# Altium PCB cm4gateway.PcbDoc (part 4 of 5)
Units mil, origin at the board's own origin, x right, y up, seen from the top; angles counter-clockwise.
Board outline 6299.21 x 4960.63 mil, 8 copper layers (Signal 1, Ground Plane 1, Signal 2, Power Plane 1, Power Plane 2, Signal 3, Ground Plane 2, Signal 4), stack 60.024 mil thick; 403 components, 273 nets, 1526 pads, 1156 vias.
Unrouted connection lines stored in the file: 5.
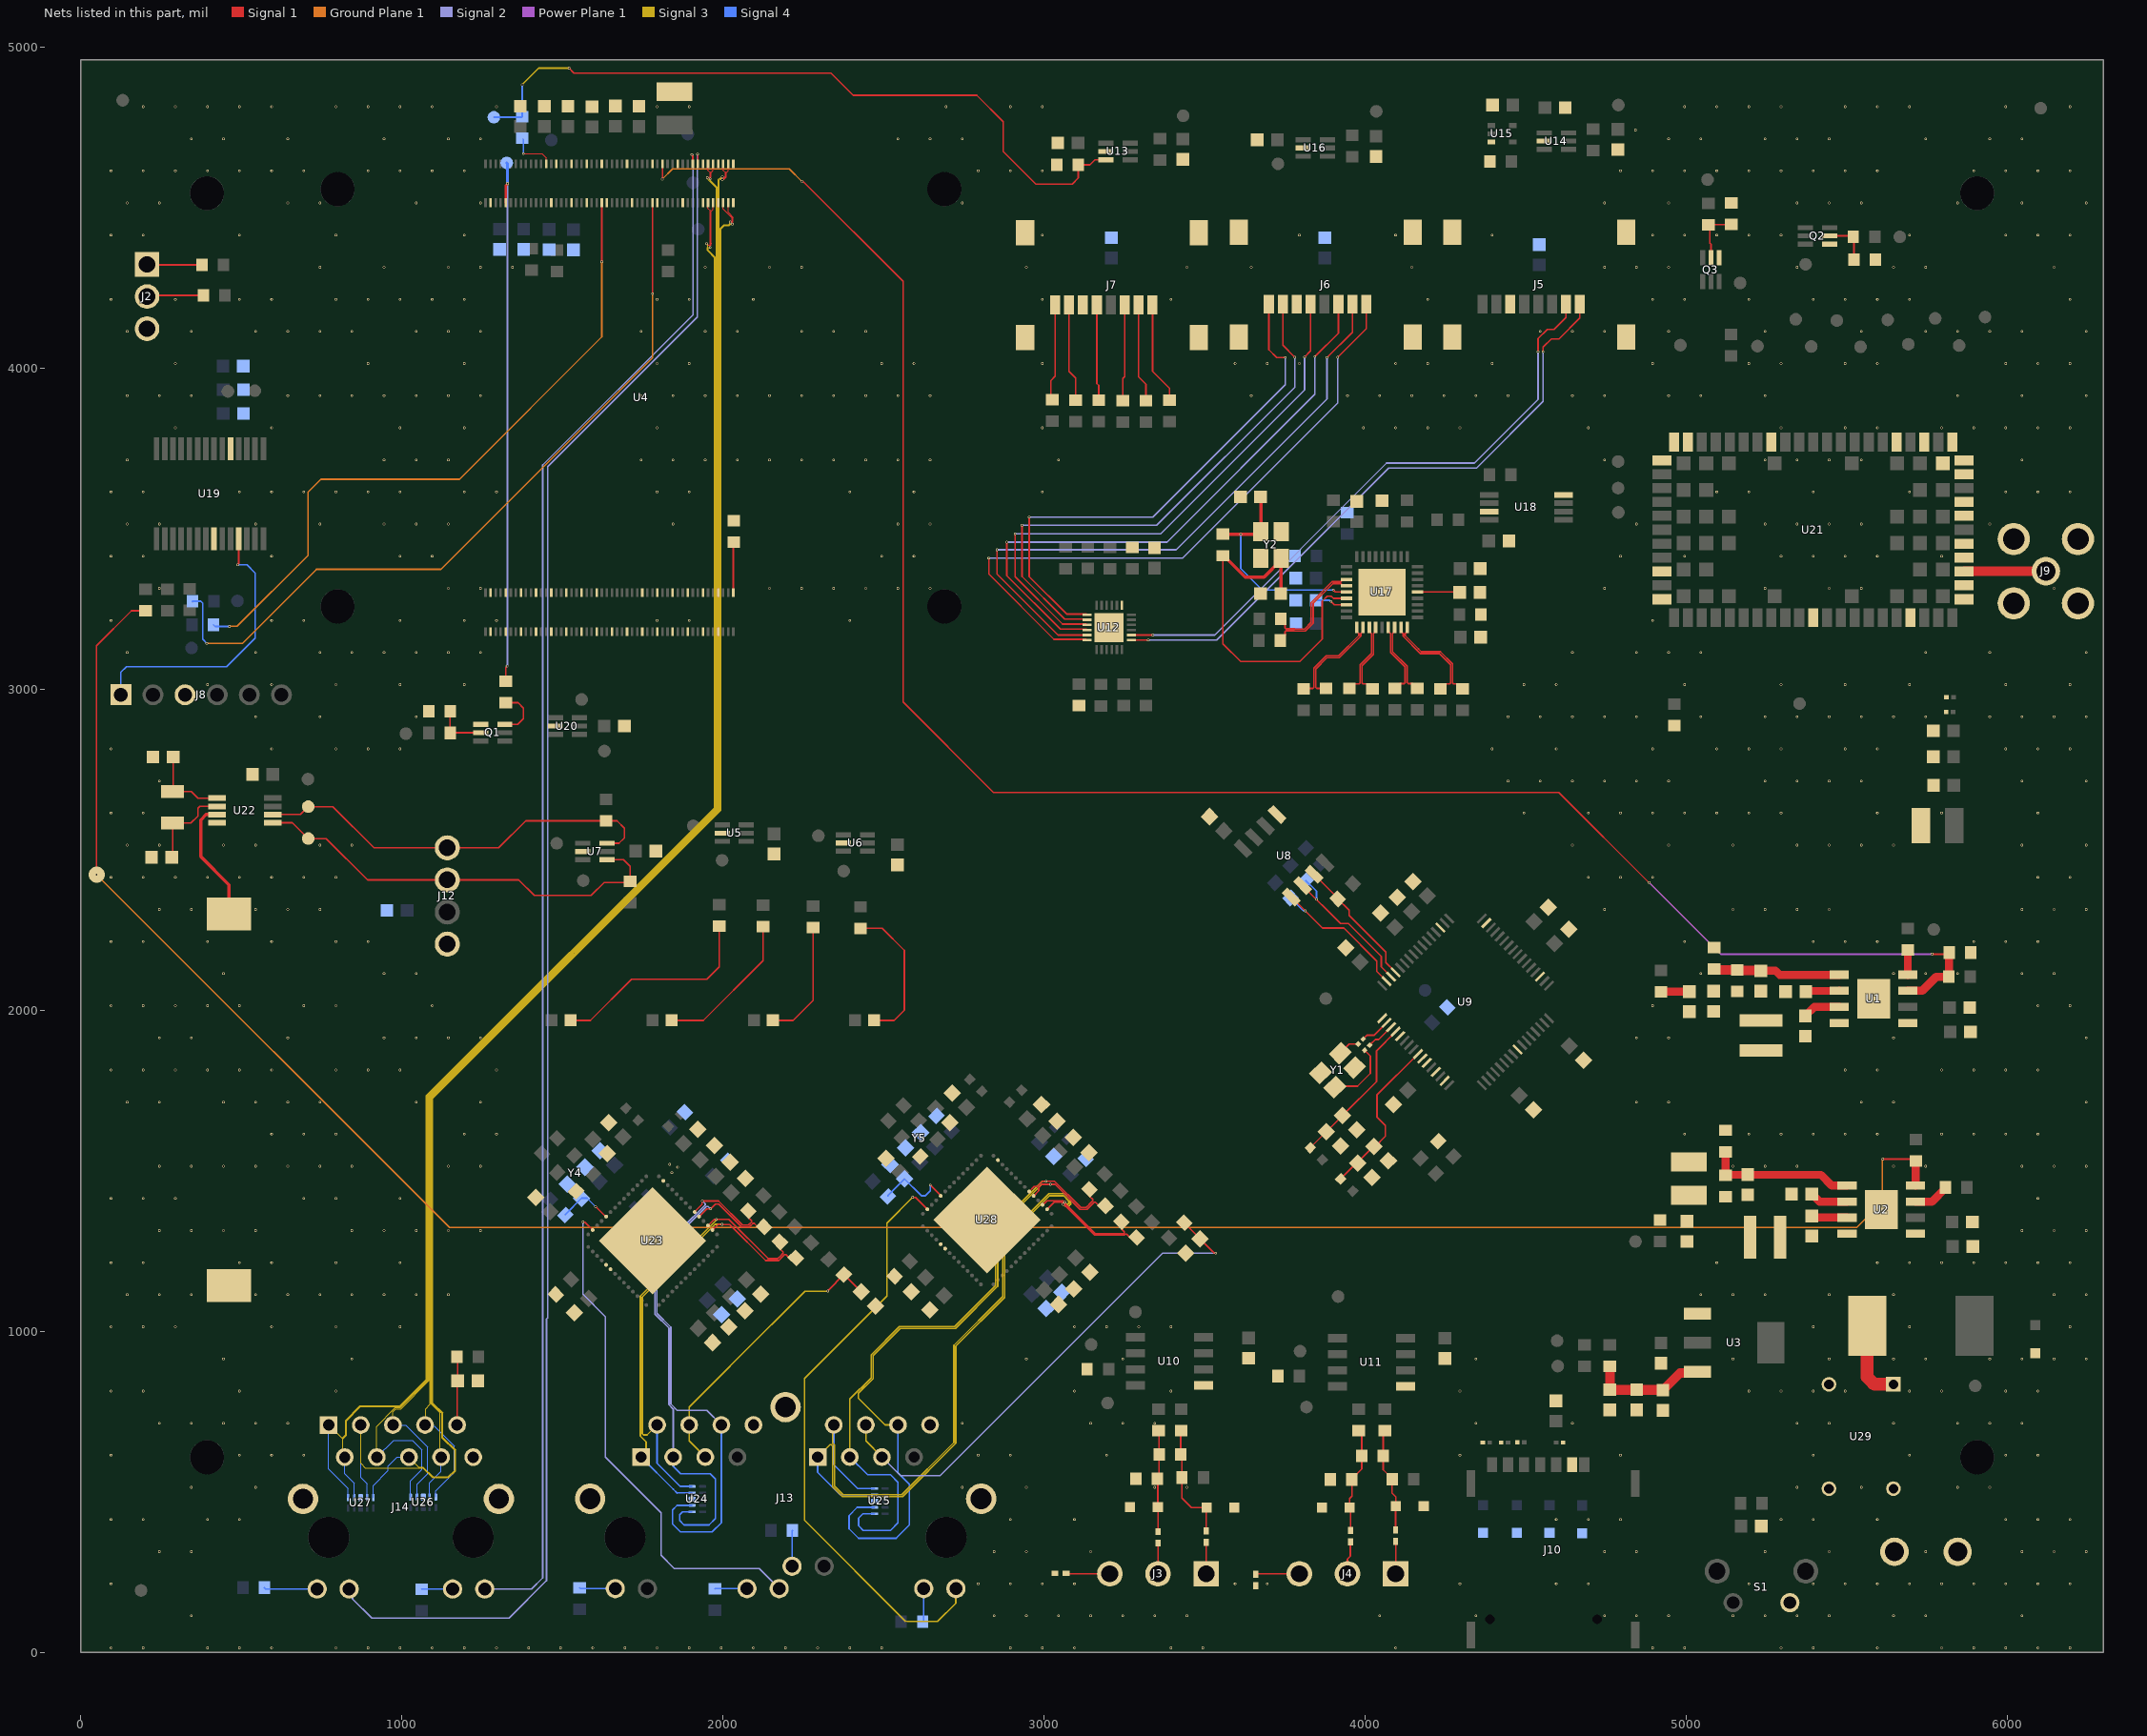
[diagram p9: the nets of this part, all layers, seen from the top]

## Via types
v1: diameter 8/8/8/8/8/8/8/8 (per signal layer), hole 5, Signal 1 to Signal 4, 822 vias
v2: diameter 8, hole 5, Signal 1 to Signal 4, tented both sides, 310 vias
v3: diameter 50, hole 28, Signal 1 to Signal 4, tented both sides, 10 vias
v4: diameter 8/8/8/8/8/8/8/8 (per signal layer), hole 5, Signal 1 to Signal 4, tented both sides, 9 vias
v5: diameter 8, hole 5, Signal 1 to Signal 4, 4 vias
v6: diameter 50, hole 5, Signal 1 to Signal 4, tented both sides, 1 vias

## Nets (pads, with @x,y where several pads share a name; then routed paths per layer and width w, separated by ;. In a path a pad name is that pad's centre, name@x,y a point inside that pad or via, vN(x,y) a via of type N, cw(c..) or ccw(c..) an arc to the next point about the centre after c; other vN are vias at no path point) (continued)
ADAT2: J5.1 U12.7 | length 1954.5
  Signal 1 w5: U12.7@3271.76,3152.56 v2(3324.43,3152.56) ; v2(4554.13,4050.2) 4554.13,4064.96 4579.72,4090.55 4603.35,4090.55 4668.31,4155.51 J5.1@4668.31,4198.82
  Signal 2 w5: v2(3324.43,3152.56) 3537.54,3152.56 4072.97,3687.99 4346.59,3687.99 4554.13,3895.54 v2(4554.13,4050.2)
ADAT3: J5.2 U12.8 | length 1915.3
  Signal 1 w5: U12.8@3271.76,3168.31 v2(3338.9,3168.31) ; v2(4538.39,4050.2) 4538.39,4091.54 4566.93,4120.08 4587.6,4120.08 4625,4157.48 J5.2@4625,4198.82
  Signal 2 w5: v2(3338.9,3168.31) 3531.01,3168.31 4066.45,3703.74 4340.07,3703.74 4538.39,3902.06 v2(4538.39,4050.2)
BCLK: J6.5 U12.21 | length 1782.1
  Signal 1 w5: v2(2909.45,3483.27) 2909.45,3350.14 3057.29,3202.3 3131.26,3202.3 U12.21@3133.76,3199.8 ; v2(3811.02,4034.45) 3829.92,4053.35 J6.5@3829.92,4198.82
  Signal 2 w5: v2(2909.45,3483.27) 3362.87,3483.27 3811.02,3931.42 v2(3811.02,4034.45)
BCMD: J6.3 U12.22 | length 1885.5
  Signal 1 w5: v2(2883.86,3457.68) 2883.86,3353.46 3050.77,3186.56 3131.26,3186.56 U12.22@3133.76,3184.06 ; v2(3843.5,4035.43) 3916.53,4108.46 J6.3@3916.53,4198.82
  Signal 2 w5: v2(2883.86,3457.68) 3382.87,3457.68 3843.5,3918.31 v2(3843.5,4035.43)
BDAT0: J6.7 U12.20 | length 1719.6
  Signal 1 w5: v2(2931.1,3509.84) 2931.1,3350.76 3063.81,3218.05 3131.26,3218.05 U12.20@3133.76,3215.55 ; J6.7@3743.31,4198.82 3743.31,4070.67 v2(3780.51,4033.47)
  Signal 2 w5: v2(2931.1,3509.84) 3350.39,3509.84 3780.51,3939.96 v2(3780.51,4033.47)
BDAT1: J6.8 U12.19 | length 1670.1
  Signal 1 w5: v2(2953.74,3535.43) 2953.74,3350.39 3070.33,3233.8 3131.26,3233.8 U12.19@3133.76,3231.3 ; J6.8@3700,4198.82 3700,4056.89 3724.41,4032.48 v2(3750.98,4032.48)
  Signal 2 w5: v2(2953.74,3535.43) 3338.58,3535.43 3750.98,3947.84 v2(3750.98,4032.48)
BDAT2: J6.1 U12.24 | length 2072.1
  Signal 1 w5: v2(2827.76,3407.48) 2827.76,3358.27 3030.96,3155.06 3131.26,3155.06 U12.24@3133.76,3152.56 ; v2(3914.37,4033.47) 4003.15,4122.24 J6.1@4003.15,4198.82
  Signal 2 w5: v2(2827.76,3407.48) 3431.1,3407.48 3914.37,3890.75 v2(3914.37,4033.47)
BDAT3: J6.2 U12.23 | length 1984.9
  Signal 1 w5: v2(2853.35,3434.06) 2853.35,3358.27 3043.31,3168.31 U12.23@3133.76,3168.31 ; v2(3880.9,4032.48) 3959.84,4111.42 J6.2@3959.84,4198.82
  Signal 2 w5: v2(2853.35,3434.06) 3411.42,3434.06 3880.9,3903.54 v2(3880.9,4032.48)
CPUSUP_PPS: J8.1 U19.11 | length 882.5
  Signal 1 w5: v2(489.17,3386.81) 489.17,3387.62 492.13,3390.58 U19.11@492.13,3468.5
  Signal 4 w5: J8.1@125.2,2982.28 125.2,3052.36 142.72,3069.88 454.72,3069.88 543.31,3158.46 543.31,3361.22 517.72,3386.81 v2(489.17,3386.81)
D1_N: R75.2 U17.1 | length 303.9
  Signal 1 w5: R75.2@3808.07,3000.98 3809.06,3001.97 3836.88,3001.97 3839.81,3004.9 3839.81,3064.73 3878.42,3103.35 3916.9,3103.35 3980.27,3166.71 3980.27,3172.88 3973.42,3179.73 U17.1@3973.42,3191.93
D1_P: R74.2 U17.2 | length 303.9
  Signal 1 w5: R74.2@3877.95,3001.97 3848.74,3001.97 3845.81,3004.9 3845.81,3062.25 3880.9,3097.35 3919.39,3097.35 3986.27,3164.23 3986.27,3172.88 3993.11,3179.73 U17.2@3993.11,3191.93
D2_N: R80.2 U17.3 | length 230.7
  Signal 1 w5: R80.2@3950.79,3001.97 3965.02,3016.2 3980.99,3016.2 3983.92,3019.13 3983.92,3075.19 4019.64,3110.91 4019.64,3172.88 4012.79,3179.73 U17.3@4012.79,3191.93
D2_P: R78.2 U17.4 | length 230.7
  Signal 1 w5: R78.2@4022.64,3000.98 4007.42,3016.2 3992.85,3016.2 3989.92,3019.13 3989.92,3072.71 4025.64,3108.43 4025.64,3172.88 4032.48,3179.73 U17.4@4032.48,3191.93
D3_N: R84.2 U17.6 | length 233.1
  Signal 1 w5: U17.6@4071.85,3191.93 4071.85,3179.73 4078.69,3172.88 4078.69,3113.95 4124.46,3068.18 4124.46,3020.12 4121.53,3017.19 4107.74,3017.19 R84.2@4092.52,3001.97
D3_P: R82.2 U17.7 | length 233.1
  Signal 1 w5: U17.7@4091.53,3191.93 4091.53,3179.73 4084.69,3172.88 4084.69,3116.43 4130.46,3070.66 4130.46,3020.12 4133.39,3017.19 4147.18,3017.19 R82.2@4162.4,3001.97
D4_N: R87.2 U17.8 | length 332.5
  Signal 1 w5: U17.8@4111.22,3191.93 4111.22,3179.73 4114.23,3176.71 4115.13,3176.71 4118.06,3173.78 4118.06,3164.23 4172.15,3110.14 4231.39,3110.14 4265.7,3075.84 4265.7,3019.13 4262.77,3016.2 R87.2@4249.47,3016.2 ; R87.2@4249.47,3016.2 R87.2@4234.25,3000.98 R87.2@4249.47,3016.2
D4_P: R86.2 U17.9 | length 332.5
  Signal 1 w5: U17.9@4130.9,3191.93 4130.9,3179.73 4127.89,3176.71 4126.99,3176.71 4124.06,3173.78 4124.06,3166.71 4165.56,3125.21 4174.63,3116.14 4233.88,3116.14 4271.7,3078.32 4271.7,3019.13 4274.63,3016.2 R86.2@4287.93,3016.2 ; R86.2@4287.93,3016.2 R86.2@4303.15,3000.98 R86.2@4287.93,3016.2
D_N: R76.1 U17.30 | length 327
  Signal 1 w5: R76.1@3737.2,3218.5 3750.45,3205.26 3750.45,3190.56 3753.38,3187.63 3781.15,3187.63 3781.78,3187.01 3811.02,3187.01 3831.6,3207.58 3831.6,3269.22 3897.07,3334.69 3923.78,3334.69 3926.71,3337.62 3926.71,3338.52 3929.72,3341.54 U17.30@3941.93,3341.54
D_P: R77.1 U17.31 | length 327
  Signal 1 w5: R77.1@3735.24,3151.58 3750.45,3166.79 3750.45,3178.7 3753.38,3181.63 3778.67,3181.63 3779.29,3181.01 3813.51,3181.01 3837.6,3205.1 3837.6,3266.73 3899.56,3328.69 3923.78,3328.69 3926.71,3325.76 3926.71,3324.86 3929.72,3321.85 U17.31@3941.93,3321.85
EECLK: R33.1 U8.2 U9.62 | length 484.1
  Signal 1 w5: U8.2@3804.9,2388.09 3923.45,2269.55 3947.69,2269.55 4050.12,2167.12 4050.12,2134.77 U9.62@4080.62,2104.27
  Signal 4 w5: R33.1@3815.22,2403.55 3848.42,2370.35 v2(3848.42,2345.47)
EECS: R32.1 U8.1 U9.63 | length 487.4
  Signal 1 w5: U8.1@3769.55,2352.74 3866.66,2255.63 3933.77,2255.63 4036.2,2153.2 4036.2,2120.85 U9.63@4066.7,2090.35
  Signal 4 w5: R32.1@3767.03,2349.38 3806.78,2309.63 3812.42,2309.63 v2(3812.99,2309.06)
EEDATA: R35.1 U8.3 U9.61 | length 410.6
  Signal 1 w5: U8.3@3840.26,2423.45 3914.59,2349.12 R35.1@3914.59,2346.42 3949.8,2311.21 3949.8,2295.28 4064.04,2181.04 4064.04,2148.69 U9.61@4094.54,2118.19
ETH_LEDG: J14.14 U4.17 | length 4853.3
  Signal 1 w5: v2(1903.29,4664.69) 1903.29,4663.88 1906.27,4660.9 U4.17@1906.27,4635.66
  Signal 2 w5: J14.14@1258.33,197.35 1404.04,197.35 1438.98,232.28 1438.98,3697.83 1906.5,4165.36 1906.5,4662.4 v2@1903.54,4665.35
ETH_LEDY: J14.12 U4.15 | length 5381.2
  Signal 1 w5: v2(1921.01,4665.68) 1921.01,4664.86 1922.02,4663.85 U4.15@1922.02,4635.66
  Signal 2 w5: J14.12@836.28,197.35 846.77,186.86 846.77,166.02 906.5,106.3 1333.66,106.3 1450.79,223.42 1450.79,1037.67 1454.35,1041.23 1454.35,3692.54 1920.27,4158.47 1920.27,4665.35 v2@1921.26,4666.34
ETH_P0_N: J14.2 U4.10 U27.2 | length 4618.4
  Signal 1 w2: v2(1960.1,4375.53) 1960.93,4376.35 1960.93,4380.6 1962.98,4382.65 1962.98,4387.82 1962.89,4387.91 1962.89,4488.19 1969.26,4494.56 U4.10@1969.26,4514.4
  Signal 3 w2: J14.2@822.3,607.98 816.87,613.41 816.87,665.07 827.8,676 827.8,721.2 871.37,764.76 995.08,764.76 1079.49,849.17 1079.49,1733.03 1976.38,2629.92 1976.38,4344.49 1953.86,4367.01 1953.86,4373.53 1955.03,4374.7 1959.28,4374.7 v2(1960.1,4375.53)
  Signal 4 w2: J14.2@822.3,607.98 822.3,556.63 852.36,526.58 U27.2@852.36,481.69
ETH_P0_P: J14.1 U4.12 U27.1 | length 4741.2
  Signal 1 w2: v2(1948.91,4387.03) 1950.26,4387.03 1954.57,4382.72 1958.81,4382.72 1959.98,4383.89 1959.98,4386.58 1959.89,4386.67 1959.89,4491.19 1953.51,4497.56 U4.12@1953.51,4514.4
  Signal 3 w2: J14.1@772.3,707.98 813.09,667.19 814.75,667.19 824.8,677.25 824.8,722.44 870.13,767.76 993.84,767.76 1076.49,850.42 1076.49,1734.27 1973.38,2631.16 1973.38,4343.25 1950.86,4365.76 1950.86,4374.77 1952.91,4376.82 1952.91,4381.06 1948.91,4385.06 v2(1948.91,4387.03)
  Signal 4 w2: J14.1@772.3,707.98 772.3,571.2 832.68,510.83 U27.1@832.68,481.69
ETH_P1_N: J14.6 U4.6 U27.5 | length 4755.5
  Signal 1 w2: U4.6@2000.76,4514.4 2000.76,4496.06 2028.88,4467.94 2028.88,4456.72 2027.71,4455.55 2023.47,4455.55 v2(2022.64,4454.73)
  Signal 3 w2: J14.6@1022.3,607.98 1052.86,577.42 1066.28,577.42 1096.46,547.24 1144.68,547.24 1164.37,566.93 1164.37,628.63 1125.39,667.61 1125.39,744.34 1094.49,775.24 1094.49,1726.82 1992.13,2624.46 1992.13,4434.36 2003.94,4446.18 2018.33,4446.18 2021.81,4449.65 2021.81,4453.9 v2(2022.64,4454.73)
  Signal 4 w2: U27.5@911.42,481.69 911.42,519.69 957.68,565.95 957.68,580.71 984.95,607.98 J14.6@1022.3,607.98
ETH_P1_P: J14.3 U4.4 U27.4 | length 5058.2
  Signal 1 w2: U4.4@2016.51,4514.4 2016.51,4484.55 2031.88,4469.18 2031.88,4455.48 2029.83,4453.43 2029.83,4449.19 v2(2029,4448.36)
  Signal 3 w2: J14.3@872.3,707.98 872.3,588.33 886.81,573.82 1065.64,573.82 1095.21,544.24 1145.93,544.24 1167.37,565.69 1167.37,629.87 1128.39,668.85 1128.39,745.58 1097.49,776.48 1097.49,1725.58 1995.13,2623.21 1995.13,4433.12 2005.18,4443.18 2019.57,4443.18 2023.93,4447.53 2028.17,4447.53 v2(2029,4448.36)
  Signal 4 w2: J14.3@872.3,707.98 872.3,544.04 891.73,524.61 U27.4@891.73,481.69
ETH_P2_N: J14.5 U4.9 U26.2 | length 4673.9
  Signal 1 w2: v2@1960.26,4588.28 1961.08,4589.11 1961.08,4593.35 1962.89,4595.15 1962.89,4608.74 1969.26,4615.11 U4.9@1969.26,4635.66
  Signal 3 w2: J14.5@972.3,707.98 972.3,749.78 981.28,758.76 997.56,758.76 1085.49,846.69 1085.49,1730.55 1982.38,2627.44 1982.38,4561.91 1961.08,4583.21 1961.08,4587.45 v2@1960.26,4588.28
  Signal 4 w2: J14.5@972.3,707.98 1011.74,707.98 1079.72,640 1079.72,556.1 1047.24,523.62 U26.2@1047.24,483.66
  other v2: 1960.67,4588.69
ETH_P2_P: J14.4 U4.11 U26.1 | length 4835.5
  Signal 1 w2: v2(1951.77,4592.52) 1952.6,4593.35 1956.84,4593.35 1959.89,4596.39 1959.89,4609.36 1953.51,4615.73 U4.11@1953.51,4635.66
  Signal 3 w2: J14.4@922.3,607.98 927.74,613.41 921.26,619.89 921.26,702.98 980.04,761.76 996.32,761.76 1082.49,847.93 1082.49,1731.79 1979.38,2628.68 1979.38,4560.67 1954.26,4585.79 1954.26,4588.41 1951.77,4590.9 v2(1951.77,4592.52)
  Signal 4 w2: J14.4@922.3,607.98 974.76,660.43 1032.48,660.43 1062.01,630.91 1062.01,568.9 1027.56,534.45 U26.1@1027.56,483.66
ETH_P3_N: J14.7 U4.5 U26.5 | length 4628.4
  Signal 1 w2: v2(1998.03,4595.47) 1999.2,4595.47 2002.2,4592.47 2003.86,4592.47 2007.13,4595.75 2007.13,4609.03 2000.76,4615.41 U4.5@2000.76,4635.66
  Signal 3 w2: J14.7@1072.3,707.98 1073.82,709.5 1073.82,758.08 1088.49,772.75 1088.49,1729.3 1985.38,2626.19 1985.38,4586.89 1990.96,4592.47 1993.86,4592.47 1996.86,4595.47 v2(1998.03,4595.47)
  Signal 4 w2: J14.7@1072.3,707.98 1075.87,704.41 1101.69,704.41 1163.39,642.72 1163.39,560.04 1106.3,502.96 U26.5@1106.3,483.66
ETH_P3_P: J14.8 U4.3 U26.4 | length 4572.7
  Signal 1 w2: v2(1998.03,4586.47) 1999.2,4586.47 2002.2,4589.47 2005.1,4589.47 2010.13,4594.5 2010.13,4608.41 2016.51,4614.79 U4.3@2016.51,4635.66
  Signal 3 w2: J14.8@1122.3,607.98 1118.92,611.36 1118.92,746.57 1091.49,774 1091.49,1728.06 1988.38,2624.95 1988.38,4585.65 1992.2,4589.47 1993.86,4589.47 1996.86,4586.47 v2(1998.03,4586.47)
  Signal 4 w2: U26.4@1086.61,483.66 1086.61,527.56 1122.3,563.25 J14.8@1122.3,607.98
ETH_TR_CT_LAN_0: C94.2 J13.A4 J13.A5 R107.1 | length 906.6
  Signal 1 w4: v2(2326.77,1125) 2327.54,1125.77 2327.54,1127.9 R107.1@2376.39,1176.76 2377.37,1176.76 C94.2@2430.85,1123.28
  Signal 3 w4: 2152.07,1021.16 2255.9,1125 v2(2326.77,1125)
  Signal 3 w5: J13.A5@1945.04,608.38 1895.04,658.38 J13.A4@1895.04,708.38 1895.04,764.13 2152.07,1021.16
ETH_TR_CT_LAN_1: C113.2 J13.B4 J13.B5 R121.1 | length 1608.8
  Signal 1 w5: R121.1@3436.06,1337.64 3530.02,1243.68 3533.87,1243.68 v2(3534.45,1243.11)
  Signal 2 w5: J13.B5@2495.04,608.38 2553.22,550.2 2676.18,550.2 3369.09,1243.11 v2(3534.45,1243.11)
  Signal 3 w5: J13.B4@2445.04,708.38 2445.04,658.38 J13.B5@2495.04,608.38
GND: C3.1 C4.1 C5.1 C6.1 C7.1 C10.1 C11.1 C12.1 C13.1 C14.1 C15.1 C16.1 C17.1 C18.1 C19.1 C20.1 C21.1 C22.1 C23.1 C24.1 C25.1 C26.1 C27.1 C28.1 C29.1 C30.1 C31.1 C32.1 C33.1 C34.1 C35.1 C36.1 C37.1 C38.1 C39.1 C40.1 C43.1 C44.1 C45.1 C46.1 C47.1 C48.1 C49.1 C50.1 C51.2 C52.1 C53.1 C54.2 C55.2 C56.1 C57.2 C58.2 C59.2 C60.2 C61.2 C62.1 C63.1 C64.1 C65.1 C66.1 C67.1 C68.1 C69.1 C70.1 C71.1 C72.1 C73.1 C74.1 C75.1 C76.1 C77.1 C78.1 C79.1 C80.2 C81.1 C82.1 C83.1 C84.1 C85.2 C86.1 C87.1 C88.1 C89.1 C90.1 C91.1 C92.1 C93.1 C94.1 C95.1 C96.1 C97.1 C98.1 C99.1 C100.1 C101.1 C102.1 C103.1 C104.1 C105.1 C106.1 C107.1 C108.1 C109.1 C110.1 C111.1 C112.1 C113.1 C114.1 C115.1 C116.1 C117.1 C118.1 C119.1 C120.1 C121.1 C122.1 C123.1 C124.1 C125.1 C126.1 C127.1 C128.1 C129.1 C130.1 C131.1 C132.1 D1.2 D3.2 D4.2 D5.2 D6.2 D11.2 D12.2 D13.2 D14.2 J2.3 J5.6 J5.G1 J5.G2 J5.G3 J5.G4 J6.6 J6.G1 J6.G2 J6.G3 J6.G4 J7.6 J7.G1 J7.G2 J7.G3 J7.G4 J8.3 J9.1 J9.2 J9.3 J9.4 J10.C5 J11.2 J12.1 J13.A8 J13.B8 J13.Shell J14.10 J14.Shell L5.1 L8.1 Q1.1 Q2.1 Q3.1 R7.1 R9.1 R16.1 R21.1 R40.1 R41.1 R42.1 R44.1 R49.1 R50.1 R52.1 R58.1 R60.1 R68.1 R79.2 R81.2 R88.2 R95.1 R102.2 R104.1 R106.1 R117.2 R119.1 R120.1 R128.2 R132.1 R133.1 S1.2 U1.1 U1.9 U2.1 U2.9 U3.1 U4.1 U4.2 U4.7 U4.8 U4.13 U4.14 U4.22 U4.23 U4.32 U4.33 U4.42 U4.43 U4.52 U4.53 U4.59 U4.60 U4.65 U4.66 U4.71 U4.74 U4.98 U4.107 U4.108 U4.113 U4.114 U4.119 U4.120 U4.125 U4.126 U4.131 U4.132 U4.137 U4.138 U4.144 U4.150 U4.155 U4.156 U4.161 U4.162 U4.167 U4.168 U4.173 U4.174 U4.179 U4.180 U4.185 U4.186 U4.191 U4.192 U4.197 U4.198 U5.2 U6.2 U7.2 U8.5 U9.1 U9.5 U9.10 U9.11 U9.13 U9.15 U9.25 U9.35 U9.47 U9.51 U10.5 U11.5 U12.13 U12.25 U13.2 U14.2 U15.3 U16.2 U17.37 U18.4 U18.7 U19.8 U19.19 U20.2 U21.1 U21.3 U21.5 U21.14 U21.20 U21.21 U21.22 U21.30 U21.32 U21.43 U21.50 U21.54 U21.55 U21.57 U21.58 U21.60 U21.61 U21.63 U21.64 U21.65 U22.4 U23.13 U23.33 U23.34 U23.57 U24.3 U25.3 U26.3 U27.3 U28.13 U28.33 U28.34 U28.57 U29.2 Y1.2 Y1.4 Y2.2 Y2.4 Y4.2 Y5.2
  other v1: 94.83,13.87 194.83,13.87 394.83,13.87 494.83,13.87 594.83,13.87 794.83,13.87 894.83,13.87 994.83,13.87 1094.83,13.87 1194.83,13.87 1294.83,13.87 1394.83,13.87 1494.83,13.87 1594.83,13.87 1694.83,13.87 1794.83,13.87 1894.83,13.87 1994.83,13.87 2094.83,13.87 2194.83,13.87 2294.83,13.87 2394.83,13.87 2494.83,13.87 2894.83,13.87 2994.83,13.87 3094.83,13.87 3394.83,13.87 3494.83,13.87 4094.83,13.87 4894.83,13.87 4994.83,13.87 5294.83,13.87 5394.83,13.87 5594.83,13.87 5794.83,13.87 5894.83,13.87 5994.83,13.87 6094.83,13.87 6194.83,13.87 344.83,113.87 2844.83,113.87 2944.83,113.87 3044.83,113.87 3144.83,113.87 3244.83,113.87 3344.83,113.87 3444.83,113.87 4044.83,113.87 4344.83,113.87 4744.83,113.87 4844.83,113.87 4944.83,113.87 5144.83,113.87 5244.83,113.87 5344.83,113.87 5444.83,113.87 5644.83,113.87 5744.83,113.87 6044.83,113.87 94.83,213.87 2794.83,213.87 2894.83,213.87 2994.83,213.87 3094.83,213.87 3594.83,213.87 3694.83,213.87 4294.83,213.87 4594.83,213.87 4694.83,213.87 5194.83,213.87 5394.83,213.87 5494.83,213.87 5594.83,213.87 5694.83,213.87 5794.83,213.87 5894.83,213.87 5994.83,213.87 6094.83,213.87 6194.83,213.87 244.83,313.87 344.83,313.87 2844.83,313.87 2944.83,313.87 3144.83,313.87 4744.83,313.87 4844.83,313.87 5244.83,313.87 5444.83,313.87 5744.83,313.87 6044.83,313.87 6144.83,313.87 6244.83,313.87 94.83,413.87 194.83,413.87 394.83,413.87 494.83,413.87 2894.83,413.87 3094.83,413.87 4594.83,413.87 4694.83,413.87 4794.83,413.87 5294.83,413.87 5394.83,413.87 5594.83,413.87 5994.83,413.87 6094.83,413.87 6194.83,413.87 344.83,513.87 544.83,513.87 2744.83,513.87 2944.83,513.87 3344.83,513.87 3444.83,513.87 5344.83,513.87 5544.83,513.87 5844.83,513.87 5944.83,513.87 94.83,613.87 494.83,613.87 594.83,613.87 694.83,613.87 2794.83,613.87 2894.83,613.87 3194.83,613.87 4294.83,613.87 4794.83,613.87 5394.83,613.87 5694.83,613.87 5994.83,613.87 6094.83,613.87 244.83,713.87 344.83,713.87 444.83,713.87 544.83,713.87 644.83,713.87 2744.83,713.87 3144.83,713.87 3244.83,713.87 3344.83,713.87 4344.83,713.87 4644.83,713.87 5344.83,713.87 5444.83,713.87 5644.83,713.87 5844.83,713.87 5944.83,713.87 6044.83,713.87 94.83,813.87 194.83,813.87 494.83,813.87 794.83,813.87 3094.83,813.87 3394.83,813.87 4294.83,813.87 5194.83,813.87 5294.83,813.87 5394.83,813.87 5494.83,813.87 5694.83,813.87 5794.83,813.87 5994.83,813.87 6094.83,813.87 444.83,913.87 844.83,913.87 2944.83,913.87 3244.83,913.87 4344.83,913.87 5144.83,913.87 5444.83,913.87 5644.83,913.87 5744.83,913.87 5944.83,913.87 6044.83,913.87 6144.83,913.87 6244.83,913.87 94.83,1013.87 194.83,1013.87 294.83,1013.87 594.83,1013.87 794.83,1013.87 994.83,1013.87 3094.83,1013.87 3194.83,1013.87 3294.83,1013.87 3394.83,1013.87 5394.83,1013.87 5694.83,1013.87 6194.83,1013.87 144.83,1113.87 244.83,1113.87 344.83,1113.87 544.83,1113.87 644.83,1113.87 744.83,1113.87 844.83,1113.82 944.83,1113.87 1044.83,1113.87 1144.83,1113.87 5044.83,1113.87 5144.83,1113.87 5244.83,1113.87 5444.83,1113.87 5644.83,1113.87 6144.83,1113.87 6244.83,1113.87 94.83,1213.87 194.83,1213.87 494.83,1213.87 594.83,1213.87 794.83,1213.87 994.83,1213.87 5094.83,1213.87 5594.83,1213.87 5694.83,1213.87 5794.83,1213.87 5894.83,1213.87 5994.83,1213.87 6094.83,1213.87 6194.83,1213.87 244.83,1313.87 344.83,1313.87 444.83,1313.87 544.83,1313.87 844.83,1313.87 944.83,1313.87 1044.83,1313.87 1144.83,1313.87 1244.83,1313.87 6044.83,1313.87 6144.83,1313.87 6244.83,1313.87 94.83,1413.87 194.83,1413.87 294.83,1413.87 694.83,1413.87 794.83,1413.87 994.83,1413.87 6094.83,1413.87 1840.93,1493.56 1858.92,1510.99 244.83,1513.87 344.83,1513.87 444.83,1513.87 544.83,1513.87 644.83,1513.87 744.83,1513.87 844.83,1513.87 1144.83,1513.87 1244.83,1513.87 5144.83,1513.87 5244.83,1513.87 5344.83,1513.87 5644.83,1513.87 5744.83,1513.87 6044.83,1513.87 6144.83,1513.87 6244.83,1513.87 1834.31,1519.85 594.83,1613.87 694.83,1613.87 794.83,1613.87 1194.83,1613.87 1294.83,1613.87 4994.83,1613.87 5194.83,1613.87 5294.83,1613.87 5394.83,1613.87 5494.83,1613.87 5594.83,1613.87 5794.83,1613.87 5894.83,1613.87 5994.83,1613.87 6094.83,1613.87 144.83,1713.87 244.83,1713.87 444.83,1713.87 544.83,1713.87 644.83,1713.87 744.83,1713.87 1044.83,1713.87 1244.83,1713.87 4844.83,1713.87 4944.83,1713.87 5544.83,1713.87 5644.83,1713.87 6244.83,1713.87 94.83,1813.87 194.83,1813.87 294.83,1813.87 394.83,1813.87 494.83,1813.87 594.83,1813.87 794.83,1813.87 894.83,1813.87 994.83,1813.87 1294.83,1813.87 5494.83,1813.87 5594.83,1813.87 5794.83,1813.87 5894.83,1813.87 5994.83,1813.87 6094.83,1813.87 244.83,1913.87 344.83,1913.87 644.83,1913.87 944.83,1913.87 1044.83,1913.87 1144.83,1913.87 1244.83,1913.87 4844.83,1913.87 4944.83,1913.87 5644.83,1913.87 6244.83,1913.87 94.83,2013.87 194.83,2013.87 294.83,2013.87 394.83,2013.87 494.83,2013.87 694.83,2013.87 794.83,2013.87 1094.83,2013.87 4894.83,2013.87 6094.83,2013.87 6194.83,2013.87 444.83,2113.87 944.83,2113.87 1044.83,2113.87 5044.83,2113.87 5644.83,2113.87 5744.83,2113.87 5844.83,2113.87 6044.83,2113.87 6144.83,2113.87 94.83,2213.87 194.83,2213.87 394.83,2213.87 594.83,2213.87 794.83,2213.87 894.83,2213.87 4994.83,2213.87 5394.83,2213.87 5494.83,2213.87 5594.83,2213.87 5894.83,2213.87 5994.83,2213.87 6094.83,2213.87 244.83,2313.87 344.83,2313.87 544.83,2313.87 644.83,2313.87 744.83,2313.87 4744.83,2313.87 5144.83,2313.87 5244.83,2313.87 5344.83,2313.87 5444.83,2313.87 6044.83,2313.87 6144.83,2313.87 6244.83,2313.87 94.83,2413.87 194.83,2413.87 294.83,2413.87 394.83,2413.87 494.83,2413.87 594.83,2413.87 694.83,2413.87 794.83,2413.87 4694.83,2413.87 4794.83,2413.87 4894.83,2413.87 6094.83,2413.87 6194.83,2413.87 144.83,2513.87 244.83,2513.87 444.83,2513.87 544.83,2513.87 744.83,2513.87 844.83,2513.87 4644.83,2513.87 4944.83,2513.87 5144.83,2513.87 5344.83,2513.87 5444.83,2513.87 5544.83,2513.87 5644.83,2513.87 6044.83,2513.87 6244.83,2513.87 94.83,2613.87 194.83,2613.87 4494.83,2613.87 4694.83,2613.87 4794.83,2613.87 4894.83,2613.87 4994.83,2613.87 5094.83,2613.87 5194.83,2613.87 5294.83,2613.87 5594.83,2613.87 5794.83,2613.87 6094.83,2613.87 244.83,2713.87 4444.83,2713.87 4544.83,2713.87 4644.83,2713.87 4744.83,2713.87 4844.83,2713.87 4944.83,2713.87 5244.83,2713.87 5344.83,2713.87 5444.83,2713.87 5544.83,2713.87 6044.83,2713.87 6244.83,2713.87 94.83,2813.87 594.83,2813.87 794.83,2813.87 894.83,2813.87 994.83,2813.87 4394.83,2813.87 4594.83,2813.87 4894.83,2813.87 5094.83,2813.87 5194.83,2813.87 5294.83,2813.87 5494.83,2813.87 5594.83,2813.87 5994.83,2813.87 6094.83,2813.87 6194.83,2813.87 544.83,2913.87 744.83,2913.87 1044.83,2913.87 4444.83,2913.87 4544.83,2913.87 4644.83,2913.87 4744.83,2913.87 4844.83,2913.87 5044.83,2913.87 5244.83,2913.87 5344.83,2913.87 5444.83,2913.87 5544.83,2913.87 5644.83,2913.87 5744.83,2913.87 5944.83,2913.87 6044.83,2913.87 6144.83,2913.87 6244.83,2913.87 394.83,3013.87 594.83,3013.87 794.83,3013.87 994.83,3013.87 1194.83,3013.87 4494.83,3013.87 4594.83,3013.87 4994.83,3013.87 5294.83,3013.87 5494.83,3013.87 5694.83,3013.87 5994.83,3013.87 6194.83,3013.87 144.83,3113.87 544.83,3113.87 744.83,3113.87 844.83,3113.87 944.83,3113.87 1044.83,3113.87 1144.83,3113.87 1244.83,3113.87 4644.83,3113.87 4844.83,3113.87 4944.83,3113.87 5044.83,3113.87 5744.83,3113.87 5944.83,3113.87 6244.83,3113.87 94.83,3213.87 594.83,3213.87 694.83,3213.87 994.83,3213.87 1194.83,3213.87 1294.83,3213.87 1794.83,3213.87 1894.83,3213.87 2394.83,3213.87 4894.83,3213.87 244.83,3313.87 1144.83,3313.87 1244.83,3313.87 2144.83,3313.87 2244.83,3313.87 2344.83,3313.87 2444.83,3313.87 2544.83,3313.87 2644.83,3313.87 4744.83,3313.87 5244.83,3313.87 5444.83,3313.87 5544.83,3313.87 6144.83,3313.87 94.83,3413.87 194.83,3413.87 594.83,3413.87 994.83,3413.87 1094.83,3413.87 2494.83,3413.87 2594.83,3413.87 4794.83,3413.87 4994.83,3413.87 5294.83,3413.87 5394.83,3413.87 5494.83,3413.87 5594.83,3413.87 5794.83,3413.87 144.83,3513.87 244.83,3513.87 544.83,3513.87 744.83,3513.87 944.83,3513.87 1044.83,3513.87 1144.83,3513.87 1844.83,3513.87 2544.83,3513.87 2644.83,3513.87 4844.83,3513.87 5244.83,3513.87 5344.83,3513.87 5444.83,3513.87 5544.83,3513.87 5944.83,3513.87 94.83,3613.87 194.83,3613.87 494.83,3613.87 594.83,3613.87 694.83,3613.87 794.83,3613.87 894.83,3613.87 994.83,3613.87 1194.83,3613.87 1294.83,3613.87 1794.83,3613.87 1894.83,3613.87 2394.83,3613.87 2594.83,3613.87 2994.83,3613.87 5094.83,3613.87 5194.83,3613.87 5394.83,3613.87 5694.83,3613.87 5994.83,3613.87 6094.83,3613.87 6194.83,3613.87 144.83,3713.87 944.83,3713.87 1044.83,3713.87 1144.83,3713.87 1744.83,3713.87 1844.83,3713.87 1944.83,3713.87 2044.83,3713.87 2144.83,3713.87 2244.83,3713.87 2344.83,3713.87 2444.83,3713.87 2544.83,3713.87 2644.83,3713.87 3044.83,3713.87 4744.83,3713.87 5244.83,3713.87 5344.83,3713.87 5444.83,3713.87 5544.83,3713.87 6044.83,3713.87 294.83,3813.87 594.83,3813.87 994.83,3813.87 1194.83,3813.87 1794.83,3813.87 2994.83,3813.87 3994.83,3813.87 4094.83,3813.87 4194.83,3813.87 4294.83,3813.87 4694.83,3813.87 5294.83,3813.87 5494.83,3813.87 5594.83,3813.87 5794.83,3813.87 5894.83,3813.87 5994.83,3813.87 6094.83,3813.87 6194.83,3813.87 144.83,3913.87 244.83,3913.87 344.83,3913.87 644.83,3913.87 744.83,3913.87 844.83,3913.87 944.83,3913.87 1044.83,3913.87 1144.83,3913.87 1244.83,3913.87 1744.83,3913.87 1844.83,3913.87 1944.83,3913.87 2044.83,3913.87 2144.83,3913.87 2244.83,3913.87 2344.83,3913.87 2444.83,3913.87 2544.83,3913.87 2644.83,3913.87 3644.83,3913.87 3944.83,3913.87 4044.83,3913.87 4144.83,3913.87 4244.83,3913.87 4344.83,3913.87 4444.83,3913.87 4644.83,3913.87 4744.83,3913.87 4944.83,3913.87 5044.83,3913.87 5244.83,3913.87 5844.83,3913.87 6044.83,3913.87 6244.83,3913.87 294.83,4013.87 894.83,4013.87 1194.83,4013.87 1794.83,4013.87 1894.83,4013.87 2494.83,4013.87 2594.83,4013.87 2994.83,4013.87 3594.83,4013.87 3694.83,4013.87 3794.83,4013.87 4094.83,4013.87 4194.83,4013.87 4394.83,4013.87 4894.83,4013.87 5194.83,4013.87 5294.83,4013.87 5494.83,4013.87 5594.83,4013.87 5994.83,4013.87 6094.83,4013.87 6194.83,4013.87 144.83,4113.87 344.83,4113.87 544.83,4113.87 644.83,4113.87 744.83,4113.87 844.83,4113.87 1044.83,4113.87 1144.83,4113.87 1244.83,4113.87 1744.83,4113.87 1944.83,4113.87 2044.83,4113.87 2244.83,4113.87 2344.83,4113.87 2444.83,4113.87 4544.83,4113.87 4644.83,4113.87 4744.83,4113.87 4944.83,4113.87 5244.83,4113.87 5544.83,4113.87 5744.83,4113.87 5844.83,4113.87 5944.83,4113.87 6044.83,4113.87 6244.83,4113.87 94.83,4213.87 294.83,4213.87 494.83,4213.87 594.83,4213.87 794.83,4213.87 894.83,4213.87 994.83,4213.87 1094.83,4213.87 1194.83,4213.87 1794.83,4213.87 1894.83,4213.87 2094.83,4213.87 2994.83,4213.87 3394.83,4213.87 4194.83,4213.87 4894.83,4213.87 4994.83,4213.87 5194.83,4213.87 5394.83,4213.87 5494.83,4213.87 5594.83,4213.87 5694.83,4213.87 6194.83,4213.87 744.83,4313.87 944.83,4313.87 1144.83,4313.87 1244.83,4313.87 1344.83,4313.87 1944.83,4313.87 2144.83,4313.87 2244.83,4313.87 2944.83,4313.87 3444.83,4313.87 3644.83,4313.87 4144.83,4313.87 4744.83,4313.87 4844.83,4313.87 4944.83,4313.87 5344.83,4313.87 5644.83,4313.87 5744.83,4313.87 6144.83,4313.87 94.83,4413.87 194.83,4413.87 494.83,4413.87 794.83,4413.87 1194.83,4413.87 2994.83,4413.87 3794.83,4413.87 4094.83,4413.87 4394.83,4413.87 4894.83,4413.87 4994.83,4413.87 5094.83,4413.87 5194.83,4413.87 5294.83,4413.87 5694.83,4413.87 5994.83,4413.87 6094.83,4413.87 6194.83,4413.87 144.83,4513.87 244.83,4513.87 644.83,4513.87 744.83,4513.87 1044.83,4513.87 1244.83,4513.87 2744.83,4513.87 4744.83,4513.87 4944.83,4513.87 5344.83,4513.87 5444.83,4513.87 5544.83,4513.87 5844.83,4513.87 6044.83,4513.87 6244.83,4513.87 94.83,4613.87 194.83,4613.87 294.83,4613.87 394.83,4613.87 494.83,4613.87 594.83,4613.87 694.83,4613.87 894.83,4613.87 994.83,4613.87 1094.83,4613.87 1194.83,4613.87 2794.83,4613.87 2894.83,4613.87 2994.83,4613.87 4794.83,4613.87 4894.83,4613.87 4994.83,4613.87 5094.83,4613.87 5194.83,4613.87 5294.83,4613.87 5394.83,4613.87 5494.83,4613.87 5594.83,4613.87 5894.83,4613.87 5994.83,4613.87 6094.83,4613.87 6194.83,4613.87 344.83,4713.87 444.83,4713.87 644.83,4713.87 944.83,4713.87 1144.83,4713.87 1244.83,4713.87 2544.83,4713.87 2644.83,4713.87 2744.83,4713.87 4944.83,4713.87 5044.83,4713.87 5244.83,4713.87 5344.83,4713.87 5444.83,4713.87 5744.83,4713.87 5944.83,4713.87 6044.83,4713.87 194.83,4813.87 294.83,4813.87 394.83,4813.87 494.83,4813.87 594.83,4813.87 794.83,4813.87 894.83,4813.87 994.83,4813.87 1094.83,4813.87 1294.83,4813.87 1794.83,4813.87 1894.83,4813.87 2694.83,4813.87 2894.83,4813.87 2994.83,4813.87 4994.83,4813.87 5094.83,4813.87 5194.83,4813.87 5294.83,4813.87 5494.83,4813.87 5594.83,4813.87 5694.83,4813.87 5994.83,4813.87 6194.83,4813.87
  other v2: 4841.53,4741.14
I2C_SCL: J12.4 R25.1 TP63.1 U7.6 U22.6 | length 1293.4
  Signal 1 w5: U22.6@598.42,2609.25 684.05,2609.25 TP63.1@708.66,2633.86 785.43,2633.86 913.58,2505.71 J12.4@1141.73,2505.71 1301.97,2505.71 1385.83,2589.57 R25.1@1635.83,2589.57 1670.27,2589.57 1692.91,2566.93 1692.91,2536.42 1676.18,2519.69 U7.6@1638.78,2519.69
I2C_SDA: J12.3 R26.1 TP64.1 U7.4 U22.5 | length 1345.8
  Signal 1 w5: U22.5@598.42,2583.66 659.45,2583.66 TP64.1@708.66,2534.45 764.76,2534.45 893.5,2405.71 J12.3@1141.73,2405.71 1363.98,2405.71 1412.4,2357.28 1589.57,2357.28 1629.92,2397.64 1697.83,2397.64 1710.63,2410.43 1710.63,2447.83 1689.96,2468.5 U7.4@1638.78,2468.5
LAN0_RX_N: J13.A6 R111.2 U23.5 U24.2 | length 1748.3
  Signal 1 w4: U23.5@1925.64,1357.28 1949.27,1380.91
  Signal 1 w5: 1949.27,1380.91 v2(1961.61,1380.91) 1976.8,1396.09 1987.16,1396.09 2058.52,1324.73 2082.16,1324.73 2086.5,1329.06 2086.5,1329.27 2093.15,1335.92 2097.29,1335.92 2107.78,1325.42 R111.2@2128.32,1325.42
  Signal 2 w5: v2@1961.57,1380.91 1953.46,1389.02 1948.87,1389.02 1875.45,1315.6 1868.75,1315.6 1794.29,1241.14 1794.29,1056.1 1837.75,1012.64 1837.75,773.46 1857.27,753.94 1949.48,753.94 J13.A6@1995.04,708.38
  Signal 4 w5: U24.2@1904.13,457.68 1857.32,457.68 1843.5,443.86 1843.5,399.61 1866.16,376.95 1868.11,375 1966.53,375 1995.04,403.5 J13.A6@1995.04,708.38
LAN0_RX_P: J13.A3 R110.2 U23.6 U24.1 | length 1651.8
  Signal 1 w5: U23.6@1911.72,1371.2 1911.72,1371.37 1935.45,1395.1 1935.45,1404.94 v2(1936.02,1405.51) 1986.22,1405.51 2061,1330.73 2079.68,1330.73 2080.5,1331.55 2080.5,1331.75 2088.9,1340.16 2088.9,1344.3 2079.11,1354.1 R110.2@2079.11,1375.62
  Signal 2 w5: J13.A3@1845.04,608.38 1845.04,757.68 1831.75,770.97 1831.75,1010.16 1788.29,1053.62 1788.29,1243.63 1866.26,1321.6 1872.97,1321.6 1944.63,1393.26 1944.63,1397.4 1936.52,1405.51 v2(1936.02,1405.51)
  Signal 4 w5: J13.A3@1845.04,608.38 1845.04,579.57 1868.51,556.1 1960.63,556.1 1976.38,540.35 1976.38,416.34 1956.7,396.67 1878.92,396.67 1865.16,410.43 1865.16,429.13 1874.02,437.99 U24.1@1904.13,437.99
LAN0_TX_N: J13.A2 R108.2 U23.2 U24.5 | length 1412.9
  Signal 1 w5: U23.2@1967.4,1315.52 1984.56,1332.68 2020.67,1332.68 2132.94,1220.41 2173.71,1220.41 2184.19,1230.89 2184.19,1231.1 2191.57,1238.48 2195.71,1238.48 2206.21,1227.98 R108.2@2226.74,1227.98
  Signal 3 w5: J13.A2@1795.04,708.38 1763.8,677.14 1752.59,677.14 1748.8,680.93 1748.8,1107.07 1974.7,1332.97 v2(1997.78,1332.97)
  Signal 4 w5: J13.A2@1795.04,708.38 1795.04,588.82 1867.13,516.73 U24.5@1904.13,516.73
LAN0_TX_P: J13.A1 R109.2 U23.3 U24.4 | length 1414.2
  Signal 1 w5: U23.3@1953.48,1329.44 1971.79,1347.75 v2@1979.44,1347.75 ; v2(1979.44,1348.32) 2018.44,1348.32 2140.34,1226.41 2171.23,1226.41 2178.19,1233.38 2178.19,1233.58 2187.33,1242.72 2187.33,1246.86 2177.53,1256.66 R109.2@2177.53,1278.18
  Signal 3 w5: J13.A1@1745.04,608.38 1760.54,623.88 1760.54,655.35 1742.8,673.09 1742.8,1109.56 1978.87,1345.62 1978.87,1347.74 v2(1979.44,1348.32)
  Signal 4 w5: J13.A1@1745.04,608.38 1845.51,507.91 ; 1857.65,495.77 1845.51,507.91 ; U24.4@1902.85,495.77 U24.4@1904.13,497.05 1856.37,497.05 1845.51,507.91
LAN1_RX_N: J13.B6 R125.2 U25.2 U28.5 | length 2153
  Signal 1 w5: U28.5@2967.6,1421.62 2983.24,1437.26 2983.24,1446.94 2993.88,1457.58 v2(3019.53,1457.58) 3034,1457.58 3111.99,1379.59 3133.83,1379.59 3145.39,1391.14 3145.39,1391.57 3155.91,1402.09 3160.05,1402.09 3171.43,1390.71 R125.2@3190.9,1390.71
  Signal 3 w5: J13.B6@2545.04,708.38 2505.21,708.38 2421.97,791.61 2421.97,807.15 2467.31,852.48 2467.31,923.91 2552.26,1008.86 2724.04,1008.86 2855.41,1140.23 2855.41,1319.98 2993.01,1457.58 v2(3019.53,1457.58)
  Signal 4 w5: U25.2@2472.5,451.48 2418.19,451.48 2392.72,426.01 2392.72,384.84 2422.24,355.32 2539.37,355.32 2580.71,396.65 2580.71,523.62 2545.04,559.29 J13.B6@2545.04,708.38
LAN1_RX_P: J13.B3 R124.2 U25.1 U28.6 | length 2040.7
  Signal 1 w5: U28.6@2953.68,1435.54 2969.32,1451.18 2978.99,1451.18 2991.13,1463.32 2994.9,1467.09 3005.33,1467.09 v2(3005.9,1467.66) 3032.4,1467.66 3114.47,1385.59 3131.35,1385.59 3139.39,1393.63 3139.39,1394.05 3151.67,1406.33 3151.67,1410.48 3141.73,1420.41 R124.2@3141.73,1441.93
  Signal 3 w5: J13.B3@2395.04,608.38 2395.04,788.7 2461.31,854.97 2461.31,926.39 2549.77,1014.86 2721.55,1014.86 2849.41,1142.72 2849.41,1322.46 2994.4,1467.46 3005.7,1467.46 v2(3005.9,1467.66)
  Signal 4 w5: J13.B3@2395.04,608.38 2450.4,553.01 2521.81,553.01 2545.27,529.55 2545.27,403.54 2521.65,379.92 2437.01,379.92 2422.24,394.69 2422.24,418.31 2435.73,431.79 U25.1@2472.5,431.79
LAN1_TX_N: J13.B2 R122.2 U25.5 U28.2 | length 2279.3
  Signal 1 w4: U28.2@3009.35,1379.86 3031.63,1402.14 3054.5,1402.14 3057.91,1398.73 3057.91,1395.9 v2(3058.67,1395.14) 3059.44,1394.37 3062.27,1394.37 3157.74,1298.9 3249.56,1298.9 3253.36,1302.71 3256.68,1302.71 3267.14,1292.24 R122.2@3288.3,1292.24
  Signal 3 w5: J13.B2@2345.04,708.38 2341.91,705.25 2341.91,651.11 2347.75,645.27 2347.75,518.02 2374.63,491.14 2557.09,491.14 2719.21,653.26 2719.21,956.04 2871.06,1107.9 2871.06,1284.45 3014.86,1428.24 3063.04,1428.24 3082.46,1408.82 3082.46,1395.53 3076.02,1389.09 3066.9,1389.09 3061.43,1394.56 3059.25,1394.56 v2(3058.67,1395.14)
  Signal 4 w5: J13.B2@2345.04,708.38 2345.04,585.08 2419.59,510.53 U25.5@2472.5,510.53
LAN1_TX_P: J13.B1 R123.2 U25.4 U28.3 | length 2238.3
  Signal 1 w4: U28.3@2995.43,1393.78 3008.79,1407.14 3058.32,1407.14 3063.88,1401.58 v2(3064.96,1401.58) 3065.73,1400.81 3065.73,1397.98 3159.81,1303.9 3247.49,1303.9 3249.83,1306.24 3249.83,1309.56 3240.12,1319.27 R123.2@3240.12,1341.5
  Signal 3 w5: J13.B1@2295.04,608.38 2333.52,646.86 2337.67,646.86 2341.75,642.78 2341.75,515.54 2372.14,485.14 2559.57,485.14 2725.21,650.78 2725.21,953.55 2877.06,1105.41 2877.06,1281.96 3017.34,1422.24 3060.55,1422.24 3076.46,1406.34 3076.46,1398.02 3073.53,1395.09 3069.39,1395.09 3066.46,1398.02 3066.46,1399.26 3064.96,1400.76 v2(3064.96,1401.58)
  Signal 4 w5: J13.B1@2295.04,608.38 2295.04,560.28 2364.47,490.85 U25.4@2472.5,490.85
LNKA_LED_K_LAN_0: J13.A12 U23.27 | length 1590.6
  Signal 1 w5: v2(1563.98,1340.55) 1564.55,1339.98 1569.9,1339.98 U23.27@1594.36,1315.52
  Signal 2 w5: v2(1563.98,1340.55) 1563.98,1115.16 1633.86,1045.28 1633.86,608.27 1807.09,435.04 1807.09,302.16 1848.42,260.83 2112.67,260.83 J13.A12@2174.96,198.53
LNKA_LED_K_LAN_1: J13.B12 U28.27 | length 1877.2
  Signal 1 w4: v2(2590.55,1417.32) 2591.32,1416.56 2599.62,1416.56 U28.27@2636.31,1379.86
  Signal 3 w5: v2(2590.55,1417.32) 2510.33,1337.11 2510.33,1109.74 2253.94,853.35 2253.94,411.42 2568.9,96.46 2668.31,96.46 2725.35,153.5 J13.B12@2725.35,198.53
NetC1_1: C1.1 U1.7 | length 116.9
  Signal 1 w25: C1.1@5370.66,1982.34 5398.61,2010.3 U1.7@5476.01,2010.3
NetC1_2: C1.2 L1.1 U1.8
NetC2_1: C2.1 R5.2 R9.2 U1.5 | length 424.9
  Signal 1 w25: 5204.72,2123.58 5277.01,2123.58 5290.29,2110.3 U1.5@5476.01,2110.3
  Signal 1 w30: R9.2@5086.21,2128.01 5088.92,2125.3 5096.33,2125.3 5096.56,2125.06 R5.2@5158.06,2125.06 5159.54,2123.58 5204.72,2123.58 5230.4,2123.58 C2.1@5231.88,2122.11
NetC2_2: C2.2 C3.2 C4.2 L1.2 R2.1 R5.1 | length 88.6
  Signal 1 w25: R2.1@4921.26,2057.09 4921.78,2057.61 5008.92,2057.61 C4.2@5009.44,2058.13
NetC7_2: C7.2 U1.6 | length 105.3
  Signal 1 w25: C7.2@5371.64,2058.13 5373.51,2060 5475.72,2060 U1.6@5476.01,2060.3
NetC8_1: C8.1 U2.7 | length 111.5
  Signal 1 w25: C8.1@5390.75,1359.25 5395.96,1354.04 5499.7,1354.04 U2.7@5500,1353.74
NetC8_2: C8.2 L2.1 U2.8
NetC9_1: C9.1 R13.2 R16.2 U2.5 | length 463.1
  Signal 1 w25: R16.2@5122.05,1559.06 5122.05,1488.19 5123.03,1487.21 5419.29,1487.21 5452.46,1454.04 5499.7,1454.04 U2.5@5500,1453.74
NetC9_2: C9.2 C10.2 C11.2 L2.2 R10.1 R13.1
NetC14_2: C14.2 U2.6 | length 119
  Signal 1 w25: C14.2@5390.75,1427.17 5414.17,1403.74 U2.6@5500,1403.74
NetC16_2: C16.2 C17.2 C18.2 R17.1 U3.3 | length 369.5
  Signal 1 w30: R17.1@4761.81,890.75 C18.2@4761.81,817.91 4762.3,817.42 4926.67,817.42 C16.2@4927.16,816.93 4980.55,870.31 5030.75,870.31 U3.3@5034.45,874.02
NetC34_2: C34.2 C36.2 FB1.2 U9.9 | length 514.6
  Signal 1 w5: FB1.2@3923.59,1474.3 4025.22,1575.93 C36.2@4027.67,1575.93 4031.64,1575.93 4062.99,1607.28 4062.99,1640.75 4036.42,1667.32 4036.42,1735.75 U9.9@4164.13,1863.47
NetC35_2: C35.2 C37.2 FB2.2 U9.4 | length 471.4
  Signal 1 w5: FB2.2@3829.02,1571.62 C37.2@3928.88,1671.51 ; C37.2@3928.88,1671.51 4035.43,1778.06 4035.43,1873.96 U9.4@4094.54,1933.06
NetC41_1: C41.1 U9.2 | length 93.9
  Signal 1 w5: C41.1@3993.81,1910.23 4005.83,1922.24 4028.04,1922.24 U9.2@4066.7,1960.9
NetC41_2: C41.2 Y1.1 | length 68
  Signal 1 w5: Y1.1@3922.02,1866.03 3950.21,1894.22 3977.8,1894.22 C41.2@3978.22,1894.64
NetC42_1: C42.1 U9.3 | length 89.9
  Signal 1 w5: C42.1@4013.86,1891.16 4031.17,1908.47 4042.1,1908.47 U9.3@4080.62,1946.98
NetC42_2: C42.2 Y1.3 | length 208.1
  Signal 1 w5: Y1.3@3905.32,1760.24 3908.1,1763.02 3975.62,1763.02 4015.99,1803.4 4015.99,1857.84 C42.2@3998.27,1875.57
NetC69_2: C69.2 R85.2 U17.33 Y2.1 | length 1178.2
  Signal 1 w5: R85.2@3557.08,3415.36 3557.08,3140.75 3612.2,3085.63 3796.26,3085.63 3866.14,3155.51 3866.14,3273.62 3881.89,3289.37 3893.7,3289.37 3900.59,3282.48 U17.33@3941.93,3282.48
  Signal 1 w10: R85.2@3559.05,3415.36 3625.98,3348.43 3685.04,3348.43 Y2.1@3738.19,3401.57 ; C69.2@3737.2,3297.25 3738.19,3298.23 Y2.1@3738.19,3401.57 ; Y2.1@3738.19,3407.48 Y2.1@3738.19,3401.57
NetC70_2: C70.2 R85.1 U17.32 Y2.3 | length 697.2
  Signal 1 w5: v2(3900.59,3308.07) 3901.4,3308.07 3907.31,3302.17 U17.32@3941.93,3302.17
  Signal 1 w10: R85.1@3557.08,3482.29 v2(3612.2,3482.29) 3667.31,3482.29 Y2.3@3675.19,3490.16 3675.19,3597.45 C70.2@3674.21,3598.43
  Signal 4 w5: v2(3612.2,3482.29) 3612.2,3375.01 3679.13,3308.07 v2(3900.59,3308.07)
NetC71_2: C71.2 U17.34 | length 101.2
  Signal 1 w5: v2(3893.7,3272.64) 3903.54,3262.8 U17.34@3941.93,3262.8
  Signal 4 w5: C71.2@3846.46,3276.58 3888.95,3276.58 3892.89,3272.64 v2(3893.7,3272.64)
NetC72_2: C72.2 U17.14 | length 132.3
  Signal 1 w5: U17.14@4162.4,3302.17 4293.31,3302.17 C72.2@4294.29,3301.18
NetC90_2: C90.2 U22.1 Y3.1 | length 255.4
  Signal 1 w5: C90.2@288.39,2788.39 288.39,2683.07 Y3.1@286.42,2681.1 344.49,2681.1 365.16,2660.43 U22.1@425.2,2660.43
NetC91_2: C91.2 U22.2 Y3.2 | length 282.3
  Signal 1 w5: C91.2@283.46,2476.38 286.42,2479.33 Y3.2@286.42,2582.68 343.51,2582.68 365.16,2604.33 365.16,2628.94 371.06,2634.84 U22.2@425.2,2634.84
NetC95_2: C95.2 R112.1 U23.24 | length 173.3
  Signal 1 w5: v2(1603.35,1387.8) 1604.16,1387.8 1634.68,1357.28 U23.24@1636.12,1357.28
  Signal 4 w5: R112.1@1509.27,1361.8 1509.27,1363.6 C95.2@1560.04,1414.37 1576.77,1414.37 v2(1603.35,1387.8)
NetC114_2: C114.2 R126.1 U28.24 | length 250.7
  Signal 1 w4: v2(2645.67,1455.71) 2645.67,1454.87 2678.07,1422.46 U28.24@2678.07,1421.62
  Signal 4 w4: R126.1@2513.82,1419.25 2513.82,1423.27 C114.2@2564.96,1474.41
  Signal 4 w5: C114.2@2564.96,1474.41 2617.13,1422.24 2630.43,1422.24 2645.67,1437.49 v2(2645.67,1455.71)
NetC115_2: C115.2 J14.9 R127.1 | length 214.3
  Signal 1 w5: R127.1@1171.26,920.28 1174.21,917.32 C115.2@1174.21,845.47 1172.3,843.56 J14.9@1172.3,707.98
NetD3_1: D3.1 L3.1 R36.1 R37.2 R38.2 | length 374.3
  Signal 1 w5: R37.2@3427.16,689.96 3425.2,687.99 R38.2@3425.2,616.14 3429.13,612.2 R36.1@3429.13,544.29 3429.13,480.31 3458.66,450.79 D3.1@3505.9,450.79 3504.92,449.8 L3.1@3504.92,377.95
NetD4_1: D4.1 L4.1 R38.1 R39.2 R41.2 | length 319.4
  Signal 1 w5: L4.1@3355.31,375.98 3355.31,451.77 D4.1@3354.33,452.76 3354.33,538.39 R41.2@3352.36,540.35 3358.27,546.26 R38.1@3358.27,616.14 3358.27,688.98 R39.2@3356.3,690.95
NetD5_1: D5.1 L6.1 R45.1 R46.2 R47.2 | length 327.8
  Signal 1 w5: R46.2@4061.02,689.96 4056.1,685.04 R47.2@4056.1,612.21 4056.1,568.9 4083.66,541.34 R45.1@4083.66,539.37 4083.66,496.06 4095.47,484.26 D5.1@4095.47,455.71 4094.49,454.73 L6.1@4094.49,380.91
NetD6_1: D6.1 L7.1 R47.1 R48.2 R50.2 | length 331.8
  Signal 1 w5: L7.1@3954.72,379.92 3954.72,447.84 D6.1@3951.77,450.79 3951.77,479.33 3958.66,486.22 R50.2@3958.66,538.39 3958.66,540.35 3989.17,570.87 R47.1@3989.17,612.21 3989.17,681.1 R48.2@3979.33,690.95
NetD7_2: D7.2 R96.2 | length 658.8
  Signal 1 w5: D7.2@1525.42,1968.19 1587.29,1968.19 1715.55,2096.46 1949.8,2096.46 1988.19,2134.84 R96.2@1988.19,2261.81
NetD8_2: D8.2 R98.2 | length 467.1
  Signal 1 w5: D8.2@1840.38,1968.19 1938.66,1968.19 2125,2154.53 R98.2@2125,2259.84
NetD9_2: D9.2 R99.2 | length 377.4
  Signal 1 w5: D9.2@2155.34,1968.19 2218.19,1968.19 2280.51,2030.51 R99.2@2280.51,2256.89
NetD10_2: D10.2 R100.2 | length 459.2
  Signal 1 w5: R100.2@2428.15,2254.92 2496.06,2254.92 2564.96,2186.02 2564.96,2000 2533.15,1968.19 D10.2@2470.3,1968.19
NetF1_1: F1.1 U29.1 | length 250.5
  Signal 1 w40: F1.1@5563,1016.73 5563,857.28 5571.86,848.41 5585.63,834.65 U29.1@5644.68,834.65
NetJ1_1: J1.1 U29.3
NetJ1_2: J1.2 U29.4
NetJ2_1: J2.1 R19.1 | length 171.9
  Signal 1 w5: J2.1@206.69,4322.44 208.27,4320.87 R19.1@377.95,4320.87
NetJ2_2: J2.2 R20.1 | length 176.8
  Signal 1 w5: J2.2@206.69,4222.44 210.63,4226.38 257.87,4226.38 R20.1@381.89,4226.38
NetJ3_1: J3.1 L3.2 | length 97.9
  Signal 1 w5: J3.1@3504.83,244.66 3504.83,342.43 L3.2@3504.92,342.52
NetJ3_2: J3.2 L4.2 | length 96.1
  Signal 1 w5: J3.2@3354.83,244.66 3354.83,340.07 L4.2@3355.31,340.55
NetJ3_3: J3.3 L5.2 | length 136.5
  Signal 1 w5: L5.2@3068.9,246.06 3070.3,244.66 J3.3@3204.83,244.66
NetJ4_1: J4.1 L6.2 | length 101
  Signal 1 w5: L6.2@4094.49,345.47 4094.83,345.13 J4.1@4094.83,244.66
NetJ4_2: J4.2 L7.2 | length 103.9
  Signal 1 w5: J4.2@3944.83,244.66 3944.83,290.3 3953.74,299.21 3953.74,343.5 L7.2@3954.72,344.49
NetJ4_3: J4.3 L8.2 | length 136
  Signal 1 w5: L8.2@3659.45,243.11 3660.99,244.66 J4.3@3794.83,244.66
NetJ7_1: J7.1 R63.2 | length 319.3
  Signal 1 w5: J7.1@3337.6,4196.85 3337.6,3990.16 3390.75,3937.01 R63.2@3390.75,3899.61
NetJ7_2: J7.2 R64.2 | length 307.6
  Signal 1 w5: J7.2@3294.29,4196.85 3294.29,3972.44 3316.93,3949.8 R64.2@3316.93,3898.62
NetJ7_3: J7.3 R65.2 | length 300.7
  Signal 1 w5: R65.2@3245.08,3898.62 3245.08,3967.52 3250.98,3973.43 J7.3@3250.98,4196.85
NetJ7_5: J7.5 R66.2 | length 299.7
  Signal 1 w5: J7.5@3164.37,4196.85 3164.37,3951.77 3170.27,3945.87 R66.2@3170.27,3899.61
NetJ7_7: J7.7 R61.2 | length 305.8
  Signal 1 w5: J7.7@3077.76,4196.85 3077.76,3989.17 3098.42,3968.51 R61.2@3098.42,3899.61
NetJ7_8: J7.8 R62.2 | length 303
  Signal 1 w5: R62.2@3025.59,3901.58 3020.67,3906.5 3020.67,3960.63 3034.45,3974.41 J7.8@3034.45,4196.85
NetJ9_5: J9.5 U21.56 | length 254.6
  Signal 1 w30: U21.56@5865.16,3366.14 5866.22,3367.21 J9.5@6119.32,3367.21
NetJ11_1: J11.1 U22.3 | length 386.7
  Signal 1 w10: U22.3@425.2,2609.25 390.75,2609.25 374.02,2592.52 374.02,2478.35 461.61,2390.75 J11.1@461.61,2300.2
NetJ13_A9: J13.A9 R113.1 | length 111.5
  Signal 4 w5: R113.1@1554.13,200.79 1556.39,198.53 J13.A9@1664.72,198.53
NetJ13_A11: J13.A11 R114.1 | length 99.9
  Signal 4 w5: R114.1@1975.39,197.84 1976.09,198.53 J13.A11@2074.96,198.53
NetJ13_B9: J13.B9 R115.1 | length 112.3
  Signal 4 w5: J13.B9@2215.12,268.22 2215.12,378.5 R115.1@2216.53,379.92
NetJ13_B11: J13.B11 R116.1 | length 104.4
  Signal 4 w5: R116.1@2622.05,95.47 2625.35,98.78 J13.B11@2625.35,198.53
NetJ14_11: J14.11 R131.1 | length 166.3
  Signal 4 w5: R131.1@571.85,201.77 576.27,197.35 J14.11@736.28,197.35
NetJ14_13: J14.13 R130.1 | length 96.5
  Signal 4 w5: R130.1@1062.01,196.85 1062.51,197.35 J14.13@1158.33,197.35
NetQ1_2: Q1.2 R94.1 R95.2 | length 163.8
  Signal 1 w5: R95.2@1150.59,2931.1 R94.1@1150.59,2863.19 1151.57,2864.17 Q1.2@1246.06,2864.17
NetQ1_6: Q1.6 R1.1 | length 160.9
  Signal 1 w5: Q1.6@1320.87,2889.76 1361.22,2889.76 1378.94,2907.48 1378.94,2940.95 1362.2,2957.68 R1.1@1323.82,2957.68
NetQ2_2: Q2.2 R103.1 R104.2 | length 153.7
  Signal 1 w5: Q2.2@5445.87,4411.42 R103.1@5516.73,4411.42 ; R104.2@5519.68,4339.57 R104.2@5521.65,4337.6 5521.65,4406.5 R103.1@5516.73,4411.42 ; R103.1@5519.68,4408.47 R103.1@5516.73,4411.42
NetQ3_2: Q3.2 R105.1 R106.2 | length 176.8
  Signal 1 w5: Q3.2@5076.5,4343.5 5076.5,4385.11 5072.83,4388.78 5072.83,4441.93 R105.1@5068.9,4445.87 5069.88,4446.85 R106.2@5139.76,4446.85
NetR1_2: R1.2 TP5.1 U4.92 | length 1744.4
  Signal 1 w5: R1.2@1323.82,3024.61 1323.82,3067.1 1327.76,3071.04 v2(1327.76,3071.85)
  Signal 1 w8: U4.92@1323.59,4514.4 1323.59,4567.69 1328.74,4572.84 v2(1328.74,4573.82)
  Signal 2 w5: v2(1327.76,3071.85) 1327.76,3072.66 1328.74,3073.65 v2(1328.74,4573.82)
  Signal 4 w5: TP5.1@1326.77,4638.78 1328.17,4637.38 1328.17,4574.39 v2(1328.74,4573.82)
  Signal 4 w8: TP5.1@1326.77,4638.78 1328.74,4636.81 v2(1328.74,4573.82)
NetR4_1: R4.1 R7.2 U1.3 U4.29 | length 6073
  Signal 1 w5: v4(1811.17,4587.93) 1811.48,4588.23 1811.48,4635.36 U4.29@1811.78,4635.66 ; v4(2246.06,4580.71) 2250,4580.71 2561.02,4269.69 2561.02,2959.65 2842.52,2678.15 4602.36,2678.15 v1@4883.86,2396.65 ; v1@5766.73,2174.21 5813.51,2174.21 R7.2@5818.49,2179.19
  Signal 1 w25: U1.3@5689.56,2060.3 5689.85,2060.59 5734.8,2060.59 5777.84,2103.63 5816.74,2103.63 R4.1@5817.51,2104.39 5818,2104.88 5818,2178.7 R7.2@5818.49,2179.19
  Power Plane 1 w5: v1(4883.86,2397.64) 5107.28,2174.21 v1@5766.73,2174.21
  Ground Plane 1 w5: v4(1811.17,4587.93) 1843.32,4620.08 2206.69,4620.08 v4(2246.06,4580.71)
  other v1: 5764.91,2175.18
NetR8_2: R8.2 U1.4 | length 76.8
  Signal 1 w25: U1.4@5689.56,2110.3 R8.2@5689.56,2187.07
NetR11_1: R11.1 U2.3 | length 113.2
  Signal 1 w25: U2.3@5713.54,1403.74 5713.84,1403.44 5764.66,1403.44 5807.09,1445.87 R11.1@5807.09,1447.84
NetR15_2: R15.2 R91.1 U2.4 | length 7276.7
  Signal 1 w5: v6(49.66,2422.13) 49.66,3135.29 158.47,3244.1 R91.1@201.77,3244.1 ; v4(5611.22,1536.42) 5708.66,1536.42 R15.2@5714.57,1530.51
  Signal 1 w25: U2.4@5713.54,1453.74 5714.27,1453.74 5714.57,1454.04 R15.2@5714.57,1530.51
  Ground Plane 1 w5: v6(49.66,2422.13) 1148.58,1323.21 5530.89,1323.21 5610.24,1402.56 5610.24,1535.43 v4(5611.22,1536.42)
NetR21_2: R21.2 U4.101 | length 157.9
  Signal 1 w5: U4.101@2032.25,3300.23 2032.25,3456.47 R21.2@2033.46,3457.68
NetR23_2: R23.2 U4.54 | length 2118
  Signal 1 w5: v2(1622.81,4330.71) U4.54@1622.81,4514.4
  Ground Plane 1 w5: v2(463.58,3194.88) 464.16,3195.46 473.02,3195.46 473.43,3195.87 487.43,3195.87 707.68,3416.11 707.68,3613.19 748.03,3653.54 1179.38,3653.54 1622.81,4096.97 v2(1622.81,4330.71)
  Signal 4 w5: R23.2@413.39,3199.8 418.31,3194.88 v2(463.58,3194.88)
NetR24_2: R24.2 U4.34 | length 2404.9
  Signal 1 w5: U4.34@1780.29,4514.4 1780.4,4514.29 1780.4,4231.41 v2(1780.51,4231.3)
  Ground Plane 1 w5: v2(392.72,3142.72) 503.94,3142.72 734.25,3373.03 1121.58,3373.03 1780.51,4031.96 v2(1780.51,4231.3)
  Signal 4 w5: R24.2@348.42,3271.65 R24.2@348.42,3273.62 374.02,3273.62 379.92,3267.72 379.92,3155.51 v2(392.72,3142.72)
NetR27_1: R27.1 R60.2 TP13.1 U13.3 | length 2284.9
  Signal 1 w5: v1(1520.67,4934.06) 1536.42,4918.31 2336.61,4918.31 2405.51,4849.41 2790.35,4849.41 2873.03,4766.73 2873.03,4674.21 2974.41,4572.83 3087.6,4572.83 3106.3,4591.53 R60.2@3106.3,4632.87 3142.72,4632.87 3158.46,4648.62 U13.3@3192.91,4648.62
  Signal 3 w5: v1@1375,4882.87 1426.04,4933.92 v1@1519.94,4933.92
  Signal 4 w5: TP13.1@1286.63,4780.83 R27.1@1373.35,4780.83 ; R27.1@1375,4782.48 v1@1375,4882.87
  other v1: 1375,4881.89
NetR27_2: R27.2 U4.75 | length 144.8
  Signal 1 w2: v2(1378.94,4667.32) 1437.01,4667.32 1449.58,4654.75 U4.75@1449.58,4635.66
  Signal 4 w2: R27.2@1375,4715.55 R27.2@1378.94,4711.62
  Signal 4 w5: v2(1378.94,4667.32) R27.2@1378.94,4711.62